# Altium PCB AirBnB-v1.1.PcbDoc (part 6 of 8)
Units mm, origin at the board's own origin, x right, y up, seen from the top; angles counter-clockwise.
Board outline 135.99 x 145 mm, 4 copper layers (Top Layer, Layer 2, Layer 3, Bottom Layer), stack 1.566 mm thick; 343 components, 205 nets, 1123 pads, 557 vias.
Unrouted connection lines stored in the file: 129.
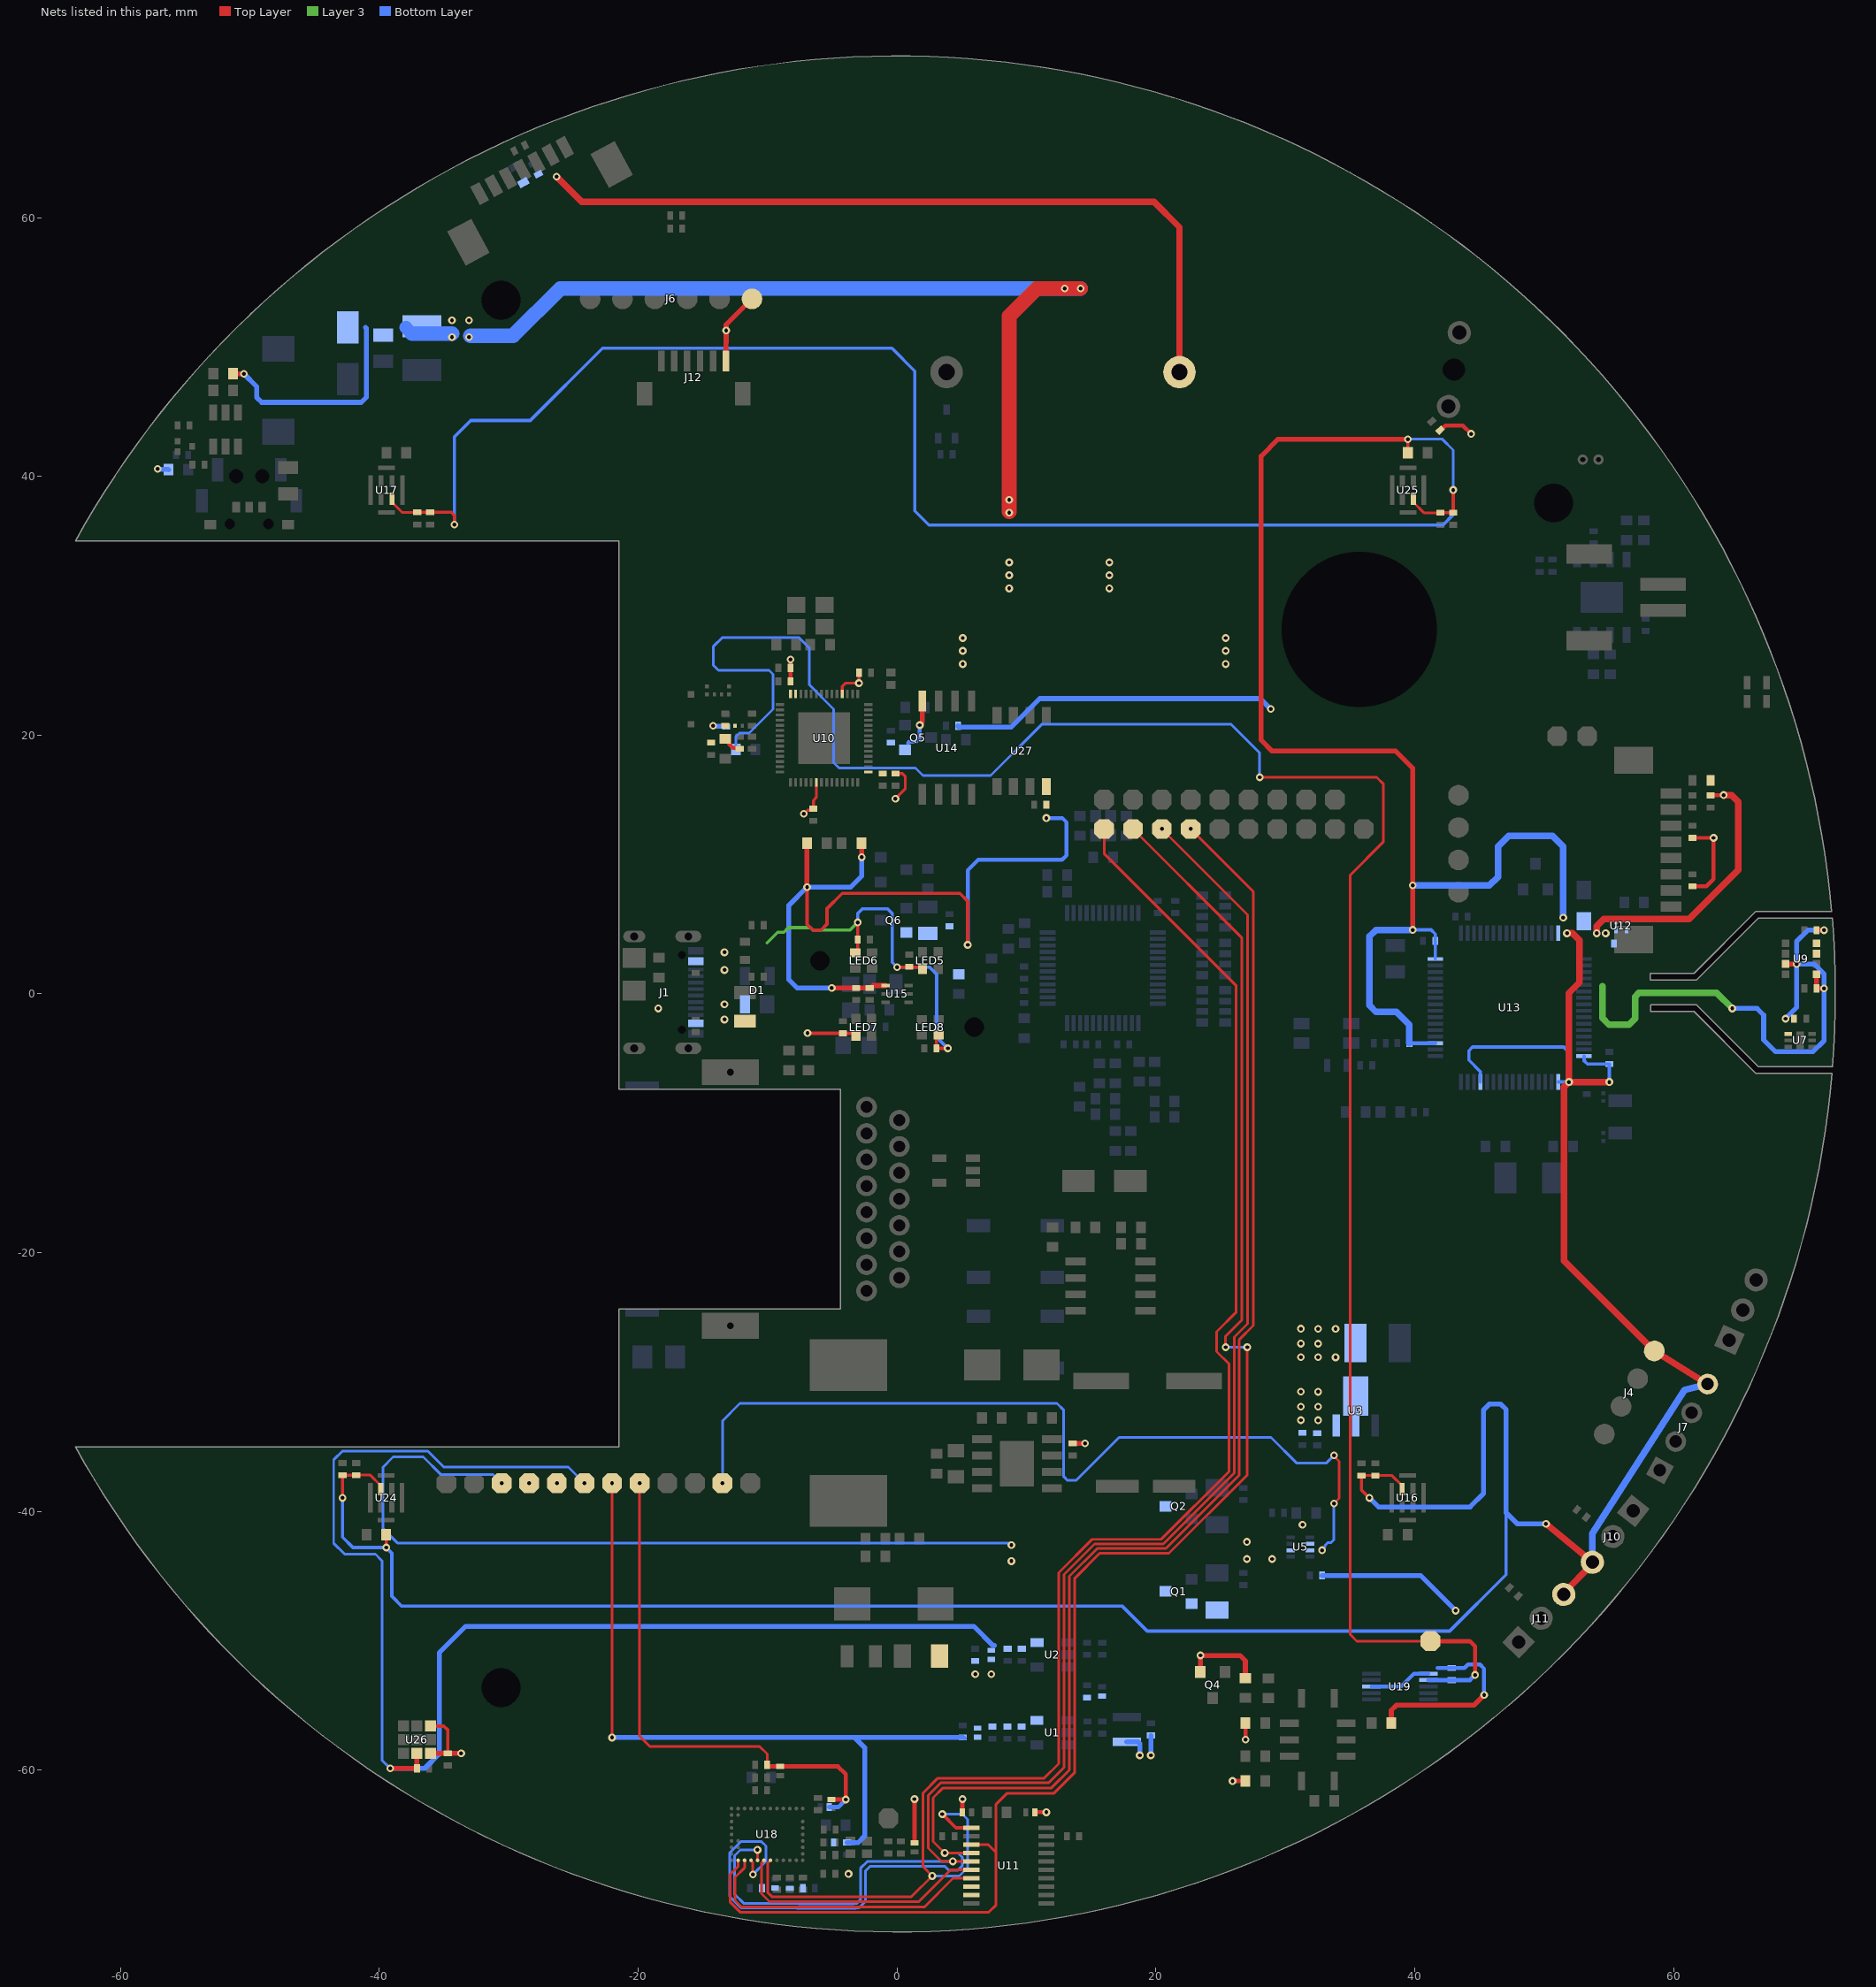
[diagram p4: the nets of this part, all layers, seen from the top]

## Via types
v1: diameter 0.6, hole 0.3, Top Layer to Bottom Layer, 557 vias

## Nets (pads, with @x,y where several pads share a name; then routed paths per layer and width w, separated by ;. In a path a pad name is that pad's centre, name@x,y a point inside that pad or via, vN(x,y) a via of type N, cw(c..) or ccw(c..) an arc to the next point about the centre after c; other vN are vias at no path point) (continued)
3V3_AUD: (continued)
  Bottom Layer w0.254: v1(-42.85,-38.951) -42.85,-41.988 -42.052,-42.786 v1(-39.476,-42.786) -39.04,-43.223 -39.04,-46.548 -38.265,-47.323 17.412,-47.323 19.336,-49.247 42.701,-49.247 47.066,-44.882 47.066,-40.104 ; v1(-34.203,36.278) -34.203,43.06 -32.941,44.322 -28.344,44.322 -22.762,49.904 -0.4,49.904 1.372,48.133 1.372,37.34 2.464,36.247 42.188,36.247 42.977,37.036 v1(42.977,38.95) ; v1(39.853,4.948) 41.265,4.948 41.584,4.629 C47.2@41.584,4.098 U13.32@41.584,2.698 ; U13.13@45.084,-6.802 45.084,-6.013 44.183,-5.111 44.183,-4.388 44.468,-4.104 51.511,-4.104 51.923,-4.516 v1(51.923,-6.806) U13.1@51.088,-6.806 ; U13.64@53.084,-4.802 53.084,-5.166 53.34,-5.421 C45.2@55.036,-5.421 v1(55.036,-6.806) C42.1@53.3,-6.806
  Bottom Layer w0.305: R27.1@39.587,-3.802 U13.19@41.584,-3.802
  Bottom Layer w0.381: v1(36.506,-38.95) 37.203,-39.647 44.284,-39.647 45.314,-38.617 45.314,-32.156 45.771,-31.699 46.63,-31.699 47.066,-32.135 47.066,-40.104 47.919,-40.957 v1(50.146,-40.957)
  Bottom Layer w0.508: R27.1@39.587,-3.802 R27.1@39.587,-3.795 39.587,-2.388 38.573,-1.374 36.994,-1.374 36.5,-0.879 36.5,4.445 37.003,4.948 v1(39.853,4.948) ; v1(39.853,8.382) 45.766,8.382 46.434,9.05 46.434,11.388 47.268,12.221 50.655,12.221 51.48,11.396 v1(51.479,5.887) v1(51.479,5.887) ; J10.3@53.729,-43.924 53.729,-41.712 60.832,-30.645 60.849,-30.619 60.869,-30.599 J7.4@62.635,-30.152
3V3_CLEAN: C3.2 C9.2 C10.2 C13.2 FB1.1 FB3.1 U1.5
3V3_SENSOR: C15.2 C112.2 FB3.2 FB14.2 P3.1 | length 56.5
  Top Layer w0.203: v1(-22.022,-57.472) v1(-22.022,-37.821)
  Bottom Layer w0.305: C15.2@5.08,-57.472 5.169,-57.472 C15.2@5.245,-57.549
  Bottom Layer w0.381: v1(-22.022,-57.472) -3.28,-57.472 ; C112.2@-3.863,-65.582 -2.996,-65.582 -2.495,-65.081 -2.495,-58.257 -3.28,-57.472 ; C15.2@5.08,-57.472 -3.28,-57.472
5V: C1.2 C17.2 C18.2 C26.2 C31.2 C36.2 C56.1 C61.1 C92.1 C93.1 D2.1 FB5.2 FB6.2 L1.1 LED5.1 LED6.1 LED7.1 LED8.1 LS1.2 P6.1 Q1.2 Q4.2 R17.1 R42.1 U3.3 U5.2 U5.7 U12.4 U12.6 | length 152.6
  Top Layer w0.254: v1@-6.901,-3.043 -3.333,-3.043 -3.174,-3.203 LED7.1@-3.174,-3.224 ; LED6.1@-3.224,3.174 -3.043,3.354 C61.1@-3.043,4.199 v1(-3.043,5.53) ; v1(0,2.074) C56.1@0.821,2.074 ; C56.1@1.075,2.066 LED5.1@1.814,2.066 ; LED8.1@3.224,-3.174 3.203,-3.174 3.043,-3.333 C93.1@3.043,-4.207 v1(3.92,-4.207)
  Top Layer w0.305: C31.2@62.866,15.342 62.897,15.372 v1(63.877,15.372)
  Top Layer w0.381: C56.1@0.821,2.074 C56.1@0.948,2.104 C56.1@1.075,2.066 ; LED5.1@1.814,2.066 LED5.1@1.974,1.924 ; Q4.2@23.441,-52.413 v1(23.441,-51.127) 26.5,-51.127 26.916,-51.542 R17.1@26.916,-52.889
  Top Layer w0.508: v1(-26.309,63.168) -24.362,61.221 19.856,61.221 21.823,59.254 LS1.2@21.823,48.058 ; v1(54.067,4.687) 54.067,5.252 54.606,5.791 61.21,5.791 65.003,9.584 65.003,14.852 64.484,15.372 v1(63.877,15.372)
  Layer 3 w0.254: -10.046,3.95 -9.229,4.766 -8.744,4.766 -8.379,5.131 -6.702,5.131 -6.511,4.94 -3.634,4.94 v1(-3.043,5.53)
  Bottom Layer w0.254: v1(-3.043,5.53) -3.043,6.227 -2.686,6.584 -0.736,6.584 -0.376,6.224 -0.376,2.45 v1(0,2.074) 2.508,2.074 3.058,1.524 3.058,-3.345 v1(3.92,-4.207)
  Bottom Layer w0.381: R42.1@4.722,20.723 4.722,20.648 4.76,20.61 8.812,20.61 11.03,22.828 28.071,22.828 v1(28.874,22.026) ; L1.1@17.755,-57.795 18.62,-57.795 18.755,-57.93 v1(18.755,-58.844) ; v1(19.609,-58.844) C1.2@19.609,-57.315
  other v1: 27.04,-43.673 28.975,-43.673 27.04,-42.348 31.327,-41.031 -28.423,-37.821 31.2,-32.946 32.542,-32.949 31.2,-31.896 32.542,-31.899 31.2,-30.746 32.542,-30.749 -6.921,-3.023 54.757,4.687 5.08,25.502 25.4,25.502 5.08,26.518 25.4,26.518 5.08,27.508 25.4,27.508
5V_BOOST: C22.2 C23.1 D4.1 P10.1 R15.2 U5.6 | length 159.7
  Top Layer w0.203: v1(33.761,-39.393) 34.167,-38.987 34.167,-36.114 33.761,-35.708 v1(33.761,-35.664)
  Top Layer w0.381: R15.2@-51.308,47.93 v1(-50.47,47.93)
  Top Layer w1.143: v1@8.663,37.257 v1(8.663,38.196) 8.663,52.396 10.789,54.521 v1(12.949,54.521) v1(14.186,54.521)
  Bottom Layer w0.203: v1(-13.487,-37.821) -13.487,-32.995 -12.141,-31.648 12.358,-31.648 12.884,-32.174 12.884,-37.302 13.184,-37.602 13.833,-37.602 17.164,-34.272 28.894,-34.272 30.891,-36.269 33.155,-36.269 v1(33.761,-35.664) ; 33.071,-42.766 33.071,-42.625 33.276,-42.42 33.503,-42.42 33.761,-42.162 v1(33.761,-39.393)
  Bottom Layer w0.381: v1(-50.47,47.93) -49.487,46.947 -49.487,46.117 -49.091,45.722 -41.405,45.722 -41.001,46.125 -41.001,51.434 -41.086,51.518
  Bottom Layer w1.016: C23.1@-37.954,51.518 C23.1@-37.479,51.044
  Bottom Layer w1.143: C23.1@-37.479,51.044 -36.728,51.044 v1@-34.392,51.044 ; v1@-32.966,50.868 -29.669,50.868 -26.016,54.521 v1(12.949,54.521) v1(14.186,54.521)
  other v1: 32.842,-42.998 8.663,37.205 -34.392,50.764 -33.071,50.764 -34.392,52.07 -33.071,52.07
5V_PoE: D8.1 P42.1 Q1.3 Q2.3 | length 64.2
  Bottom Layer w0.203: v1(-30.556,-37.821) -31.242,-37.135 -35.262,-37.135 -36.613,-35.783 -38.933,-35.783 -39.732,-36.582 -39.732,-41.307 -38.607,-42.432 8.676,-42.432 v1(8.839,-42.596)
  other v1: 8.839,-43.84
W5500_RST: R69.2 U10.16 U23.37 | length 111.4
  Top Layer w0.203: v1(-12.827,11.532) -12.215,10.919 -11.079,10.919 -9.067,12.931 -9.067,14.643 -7.839,15.871 U10.16@-7.839,16.336
  Bottom Layer w0.203: v1(-12.827,11.532) -14.797,13.502 -14.797,26.823 -13.674,27.945 -7.328,27.945 -6.387,27.004 -6.387,24.368 -3.522,21.503 -3.522,18.551 -2.767,17.796 1.694,17.796 2.282,17.209 7.02,17.209 11.046,21.234 25.985,21.234 29.449,17.77 33.838,17.77 34.902,16.707 34.902,10.322 33.632,9.052 23.082,9.052 22.488,8.458 22.488,6.589 22.147,6.248 R69.2@21.5,6.248 21.5,5.299 20.946,4.745 U23.37@20.139,4.745
#VBUS: D1.2 F1.1 J1.A4/B9 J1.B4/A9
  other v1: -13.335,-1.973 -18.45,-1.123 -13.335,-0.806 -13.335,1.85 -13.335,3.217
A1: P40.1 U11.1 U18.G1 | length 131.8
  Top Layer w0.203: U18.G1@-9.785,-66.961 -9.785,-66.984 -9.988,-67.186 -9.988,-69.457 -9.676,-69.769 1.116,-69.769 v1(2.716,-68.169) 2.01,-67.463 2.01,-61.749 3.147,-60.612 11.363,-60.612 12.487,-59.489 12.487,-44.737 15.071,-42.153 20.407,-42.153 25.659,-36.901 25.659,-28.608 24.699,-27.648 24.699,-26.106 26.183,-24.622 26.183,0.672 16.002,10.853 P40.1@16.002,12.751
  Top Layer w0.254: v1(3.499,-63.395) 4.553,-64.449 U11.1@5.734,-64.449
  Bottom Layer w0.203: v1(2.716,-68.169) 4.796,-68.169 5.446,-67.519 5.446,-63.798 5.043,-63.395 v1(3.499,-63.395)
A2: P39.1 U11.3 U18.B1 | length 128.8
  Top Layer w0.203: U18.B1@-12.285,-66.961 -12.285,-67.441 -12.888,-68.044 -12.888,-70.203 -12.122,-70.969 7.092,-70.969 7.651,-70.41 7.651,-66.292 7.651,-62.625 8.478,-61.798 12.102,-61.798 13.731,-60.169 13.731,-45.16 15.661,-43.23 21.008,-43.23 27.059,-37.179 v1(27.059,-27.304) ; U11.3@5.734,-65.749 7.047,-65.749 7.59,-66.292 ; P39.1@18.232,12.751 26.63,4.352 26.63,-25.215 25.39,-26.455 v1(25.39,-27.304)
  Bottom Layer w0.203: v1(25.39,-27.304) v1(27.059,-27.304)
A3: P36.1 U11.4 U18.D1 | length 136
  Top Layer w0.203: U18.D1@-11.285,-66.961 -11.285,-66.979 -11.142,-67.121 v1(-11.142,-68.063) ; 2.794,-65.279 2.794,-65.507 ; U11.4@5.734,-66.399 5.731,-66.396 v1(3.683,-66.396) 2.794,-65.507 ; v1(22.691,12.751) 27.534,7.908 27.534,-25.622 26.447,-26.709 26.447,-37.183 20.76,-42.869 15.459,-42.869 13.314,-45.014 13.314,-59.985 11.933,-61.366 3.557,-61.366 2.794,-62.13 2.794,-65.507
  Bottom Layer w0.203: v1(-11.142,-68.063) -10.135,-67.056 -10.135,-65.852 -10.467,-65.521 -12.083,-65.521 -12.94,-66.378 -12.94,-69.757 -12.058,-70.639 -7.766,-70.639 -7.745,-70.66 -3.194,-70.66 -3.173,-70.639 -2.94,-70.639 -2.456,-70.155 -2.456,-67.802 -2.084,-67.43 3.695,-67.43 4,-67.735 4.688,-67.735 5.055,-67.369 5.055,-66.743 4.707,-66.396 v1(3.683,-66.396)
A4: P37.1 U11.5 U18.E1 | length 129.2
  Top Layer w0.203: U18.E1@-10.785,-66.961 v1(-10.785,-66.156) ; v1@4.309,-67.046 5.731,-67.046 U11.5@5.734,-67.049 ; v1(4.309,-67.044) 3.438,-67.044 2.41,-66.016 2.41,-61.942 3.399,-60.952 11.733,-60.952 12.904,-59.781 12.904,-44.865 15.257,-42.513 20.571,-42.513 26.06,-37.024 26.06,-26.521 27.093,-25.489 27.093,6.119 v1(20.461,12.751)
  Bottom Layer w0.203: v1(-10.785,-66.156) -12.116,-66.156 -12.558,-66.598 -12.558,-69.575 -11.824,-70.309 -7.629,-70.309 -7.608,-70.33 -3.331,-70.33 -3.309,-70.309 -3.142,-70.309 -2.833,-70 -2.833,-67.583 -2.293,-67.044 v1(4.309,-67.044)
A5: U11.6 U18.F1 | length 20.1
  Top Layer w0.203: U18.F1@-10.285,-66.961 -10.285,-66.984 -10.468,-67.167 -10.468,-69.552 -9.858,-70.163 1.68,-70.163 4.143,-67.699 U11.6@5.734,-67.699
A6: U11.7 U18.C1 | length 22.8
  Top Layer w0.203: U18.C1@-11.785,-66.961 -11.785,-67.538 -12.527,-68.281 -12.527,-70.057 -12.003,-70.582 2.1,-70.582 4.333,-68.349 U11.7@5.734,-68.349
A7: U11.8
A8: U11.9
ADS_RDY: P19.1 R44.1 R76.2 U19.2 | length 161.8
  Top Layer w0.203: v1(28.018,16.747) 37.062,16.747 37.56,16.25 37.56,11.737 35.022,9.2 35.022,-49.526 35.519,-50.023 P19.1@41.213,-50.023
  Top Layer w0.33: P19.1@41.213,-50.023 44.259,-50.023 44.665,-50.428 v1(44.665,-52.632)
  Bottom Layer w0.203: R76.2@-12.466,18.91 -12.466,19.869 -12.174,20.16 -11.424,20.16 -9.579,22.005 -9.579,24.705 -9.893,25.019 -13.797,25.019 -14.207,25.429 -14.207,26.837 -13.486,27.558 -7.602,27.558 -6.795,26.751 -6.795,23.915 -4.894,22.014 -4.894,17.878 -4.473,17.457 1.428,17.457 2.006,16.878 7.222,16.878 11.174,20.83 25.818,20.83 28.018,18.629 v1(28.018,16.747)
  Bottom Layer w0.33: U19.2@41.054,-53.034 R44.1@42.851,-53.034 44.263,-53.034 v1(44.665,-52.632)

## Text inside footprints (layer, text, board x,y; h text height)
J1: Bottom Overlay "Board Edge" at -20.196,-3.302 h0.71 r270
J2: Top Overlay "PCB Edge" at 52.471,28.304 h1.2 r90
J13: Bottom Overlay "1" at -4.105,-9.881 h1 r270; Mechanical 13 "Board Cutout" at -13.818,-20.422 h1 r270
SW2: Bottom Overlay "PCB Edge" at -52.022,37.834 h0.5 r180
SW3: Top Overlay "PCB Edge" at -50.501,35.41 h0.3
SW4: Top Overlay "1" at 44.18,45.758 h0.5 r133